# Altium PCB DT01.PcbDoc (part 2 of 3)
Units mil, origin at the board's own origin, x right, y up, seen from the top; angles counter-clockwise.
Board outline 2134.7 x 2226.1 mil, 2 copper layers (Top Layer, Bottom Layer), stack 57.918 mil thick; 95 components, 87 nets, 468 pads, 300 vias.
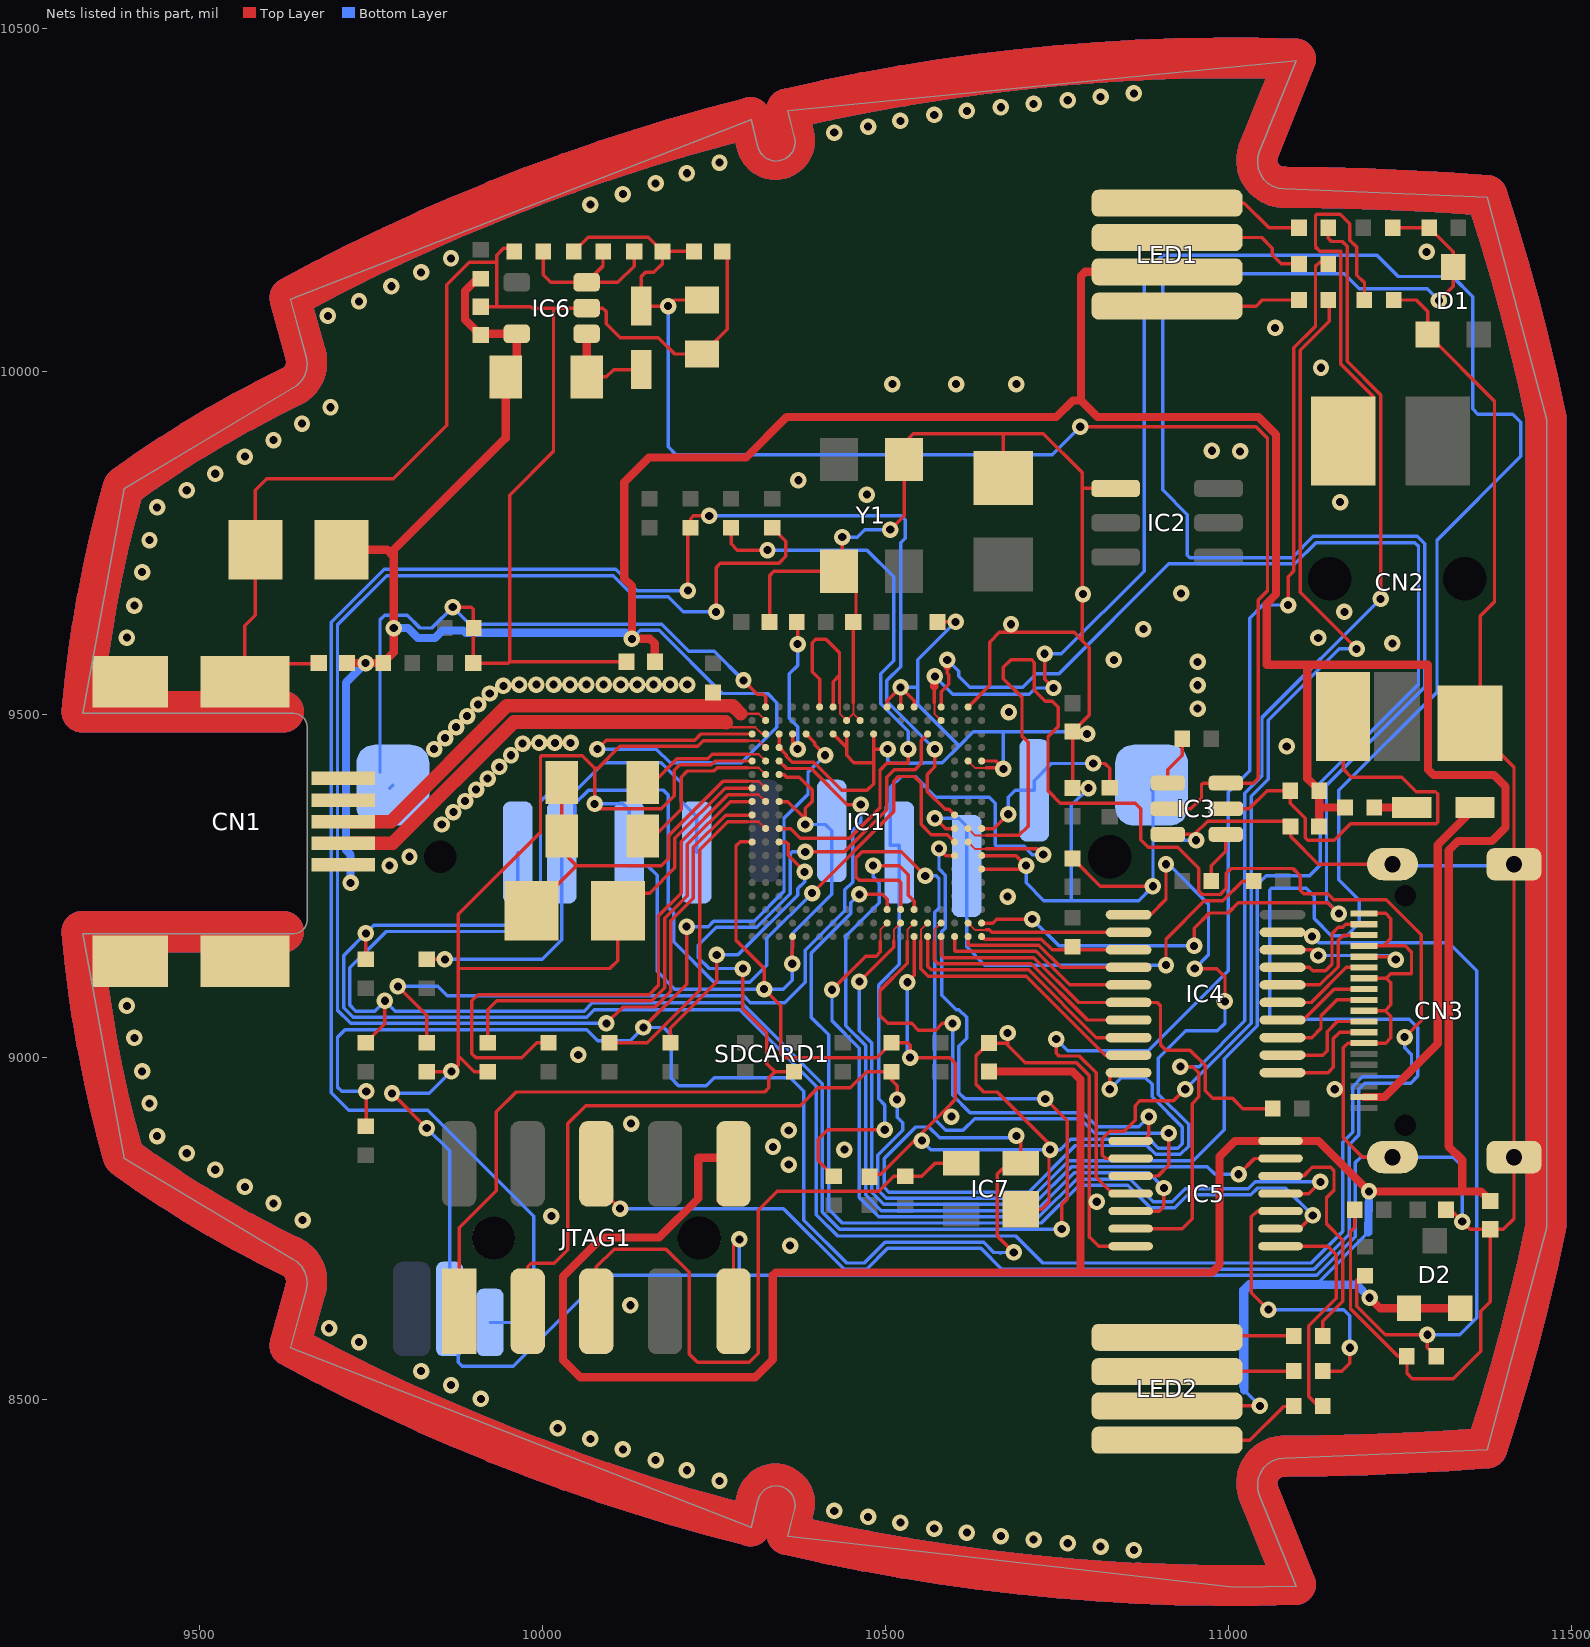
[diagram p2: the nets of this part, all layers, seen from the top]

## Via types
v1: diameter 24, hole 11.81, Top Layer to Bottom Layer, tented both sides, 295 vias
v2: diameter 24.02, hole 11.81, Top Layer to Bottom Layer, tented both sides, 5 vias

## Nets (pads, with @x,y where several pads share a name; then routed paths per layer and width w, separated by ;. In a path a pad name is that pad's centre, name@x,y a point inside that pad or via, vN(x,y) a via of type N, cw(c..) or ccw(c..) an arc to the next point about the centre after c; other vN are vias at no path point) (continued)
5V0: C15.2 C16.2 C17.2 C18.2 C19.1 C20.1 C21.1 CN1.1 D2.1 D2.2 IC1.T18 IC5.14 IC6.5 JTAG1.10 L3.1 LED1.A LED2.A R18.2 R20.2 R37.1 R42.1 | length 9669.8
  Top Layer w5: CN1.1@9709.36,9280.11 CN1.1@9710.34,9279.12 ; C18.2@9713.01,9572.3 C18.2@9715.04,9574.34 ; R42.1@9909.38,10134.7 R42.1@9909.87,10134.7 ; C15.2@9909.67,10052.76 C15.2@9909.87,10052.56 ; v1(10080.01,9449.02) 10093.01,9462.02 10222.01,9462.02 10230.91,9470.92 IC1.T18@10305.52,9470.92 ; JTAG1.10@10255.25,8790.07 10278.38,8813.21 JTAG1.10@10278.38,8844.21 10278.38,8849.02 JTAG1.10@10278.39,8900.76 ; JTAG1.10@10270.01,8790.07 JTAG1.10@10278.38,8798.45 ; LED2.A@10910.6,8491.32 v1(11045.79,8491.32) ; C20.1@11132,9336.21 11132.51,9336.72 11132.51,9363.74 ; 11132.53,9363.76 R20.2@11132.53,9388.34
  Top Layer w12: C19.1@9707.18,9739.65 9773.15,9739.65 9783.01,9729.79 ; C18.2@9715.04,9574.34 v1(9742,9574.34) R18.2@9767.66,9574.34 9783.01,9589.69 v1@9783.01,9625 ; v1(9783.01,9625.49) 9783.01,9729.79 ; R42.1@9909.38,10134.7 9904.69,10134.7 9887.01,10117.02 9887.01,10075.02 9909.47,10052.56 9909.67,10052.76 9911.44,10054.53 IC6.5@9962.36,10054.53 9962.36,10007.65 L3.1@9946.26,9991.56 9946.27,9902.28 9783.01,9739.02 9783.01,9729.79 ; C21.1@10163.75,9576.31 10163.75,9602.85 10156.85,9609.74 v1(10130.28,9609.74) 10130.28,9686.72 10119,9698 10119,9838 10155,9874 10297,9874 10356,9933 10749,9933 10773.23,9957.23 10785,9957.23 ; JTAG1.10@10278.38,8844.21 JTAG1.10@10269.59,8853 ; JTAG1.10@10278.39,8849.02 10274.4,8853 JTAG1.10@10269.59,8853 ; C16.2@10650.82,8979.01 10772.99,8979.01 10784.51,8967.49 10784.51,8686.49 ; LED1.A@10910.6,10144.87 10790.87,10144.87 10785,10139 10785,9957.23 ; C20.1@11132,9336.21 11132.51,9336.72 11132.51,9363.74 ; 11132.51,9363.78 R20.2@11132.51,9388.36 11115,9405.88 11115,9572 ; 11132.53,9363.76 11132.77,9364 R37.1@11169.99,9364 ; v1(11206,8649) 11221.41,8633.59 D2.1@11263.33,8633.59 D2.2@11338.13,8633.59 ; 11341,8805 11341,8850 11321.19,8869.81 11321.19,9301.19 11335,9315 11384,9315 11403.86,9334.86 11403.86,9394.14 11387,9411 11299,9411 11291,9419 11291,9572 11115,9572 ; C17.2@11381.93,8790.08 11368.01,8804 v1(11205,8804) 11131.34,8877.66 IC5.14@11075.97,8877.66 11009.66,8877.66 10987,8855 10987,8697 10976,8686 10340.07,8686 10335.79,8681.72 10335.79,8558.79 10310,8533 10055,8533 10030,8558 10030,8680 10087,8737 10170,8737 10227,8794 10227,8853 JTAG1.10@10269.59,8853 ; 10785,9957.23 10809.23,9933 11044,9933 11069.51,9907.49 11069.51,9674.71 11056,9661.21 11056,9572 11115,9572
  Bottom Layer w5: v1(10080.01,9449.02) 10165.73,9449.02 10185.92,9428.83 10289.9,9428.83 10341.7,9480.63 10341.7,9516.41 10328.06,9530.04 10262.26,9530.04 10170.29,9622.02 10142.55,9622.02 v1(10130.28,9609.74) ; v1(11045.79,8491.32) 11023,8514.11 11017.85,8519.26 11017.85,8661.17 11029.31,8672.63 11132.23,8672.63 11203.82,8744.22
  Bottom Layer w12: v1(9720,9254) 9720,9295 9713.5,9301.5 9713.5,9545.84 v1(9742,9574.34) ; v1(9783.01,9625.49) 9803.63,9625.49 9818.11,9611 9842.98,9611 9854,9622.02 9884.63,9622.02 9888.13,9618.52 10121.51,9618.52 v1(10130.28,9609.74) ; 11023,8514.11 11023,8659 11032,8668 11187,8668 v1(11206,8649) ; 11203.82,8744.22 v1(11205,8804)
12V: C4.2 C5.2 C6.2 D4.2 IC3.2 IC3.6 R40.2 | length 2174.7
  Top Layer w5: R40.2@10045.81,10174.58 10066.45,10195.22 10154.25,10195.22 C6.2@10174.89,10174.58 ; C5.2@10222.94,10174.58 C5.2@10220.81,10174.58 C6.2@10174.89,10174.58 ; C4.2@10232.62,10103.74 10191.86,10103.74 v1(10183.01,10094.89) D4.2@10144.06,10094.89 10144.06,10138 10150.06,10144 10162,10144 10174.89,10156.89 C6.2@10174.89,10174.58 ; v1(10784.01,9919.02) 11040.28,9919.02 11057.01,9902.29 11057.01,9679.89 11043.5,9666.38 11043.5,9406.52 11036,9399.02 IC3.6@10996.58,9399.02 ; IC3.2@10895.97,9361.98 IC3.2@10911.57,9361.98 10945.24,9361.98 10960.78,9377.52 10960.78,9397.16 10963.01,9399.39 IC3.6@10996.22,9399.39
  Bottom Layer w5: v1@10181.45,10093.33 v1(10183.01,10094.89) 10183.01,9889.61 10194.6,9878.02 10743.01,9878.02 v1(10784.01,9919.02)
CARD_DET: IC1.K3 R22.1 SDCARD1.SW3 | length 2746.8
  Top Layer w5: v1(10212.01,9680.02) 10212.01,9767.72 R22.1@10215.89,9771.61 10215.89,9784.9 10220.01,9789.02 v1(10243.01,9789.02) ; v1(10572.01,9449.02) 10572.01,9422.96 10561.01,9411.96 10561.01,9387.02 10587.01,9361.02 10592.59,9361.02 IC1.K3@10600.8,9352.81
  Bottom Layer w5: SDCARD1.SW3@9923.5,8612.95 9968.9,8612.95 9987.01,8631.05 9987.01,8768.03 9832.52,8922.52 9717.2,8922.52 9692,8947.72 9692,9634.14 9768.88,9711.02 10106.7,9711.02 10137.7,9680.02 v1(10212.01,9680.02) ; v1(10243.01,9789.02) 10523.01,9789.02 10528.8,9783.22 10528.8,9756.36 10522.01,9749.57 10522.01,9569.02 10502.01,9549.02 10502.01,9519.02 v1(10572.01,9449.02)
D+: CN1.3 IC1.U17 R16.1 | length 688.2
  Top Layer w3: 10295.71,9500.5 10315.32,9500.5 IC1.U17@10325.21,9490.61
  Top Layer w20: CN1.3@9709.38,9343.1 9779.01,9343.1 9948.24,9512.33 10248.36,9512.33 10277.12,9512.33 10288.95,9500.5
D-: CN1.2 IC1.T17 | length 698.2
  Top Layer w3: 10268.01,9487.5 10274.69,9480.81 10310.4,9480.81 10320.29,9470.92 IC1.T17@10325.21,9470.92 IC1.T17@10327.18,9470.92
  Top Layer w20: CN1.2@9709.38,9311.6 9781.46,9311.6 9958.18,9488.33 10267.18,9488.33 10268.01,9487.5
GND: C1.2 C2.1 C3.2 C4.1 C5.1 C7.1 C8.1 C9.1 C10.2 C11.2 C12.2 C13.2 C14.2 C15.1 C16.1 C17.1 C18.1 C19.2 C20.2 C21.2 CN1.4 CN1.5 CN1.MH1 CN1.MH2 CN1.MH3 CN1.MH4 CN2.1 CN3.1 CN3.4 CN3.7 CN3.10 CN3.13 CN3.MH1 CN3.MH2 CN3.MH3 CN3.MH4 D1.1 IC1.A6 IC1.A15 IC1.F1 IC1.G1 IC1.H18 IC1.L16 IC1.M18 IC1.N16 IC1.P1 IC1.P2 IC1.P18 IC1.R16 IC1.R17 IC1.T9 IC1.T11 IC1.T12 IC1.T16 IC1.U10 IC1.U11 IC1.V2 IC1.V6 IC1.V7 IC1.V8 IC1.V12 IC1.V13 IC1.V17 IC2.1 IC3.3 IC4.10 IC5.7 IC6.2 IC7.1 JTAG1.9 JTAG1.PEGA JTAG1.PEGB R4.2 R6.2 R15.2 R17.2 R19.2 R21.2 R32.1 R45.1 SDCARD1.3 SDCARD1.6 SDCARD1.MH1 SDCARD1.MH2 SDCARD1.SW1 Y1.2 Y1.4 | length 35773.3
  Top Layer w3: 10299.03,9461.13 10315.32,9461.13 IC1.R17@10325.21,9451.24 ; 10433.43,9515.92 10433.43,9500.5 IC1.U11@10443.27,9490.66 ; IC1.U11@10443.22,9490.61 IC1.U11@10443.27,9490.66 ; IC1.U11@10443.32,9490.61 IC1.U11@10443.27,9490.66 ; 10453.11,9516.82 10453.11,9500.5 ; IC1.U10@10463,9490.61 10453.11,9500.5 ; IC1.P2@10620.48,9431.55 10630.37,9421.66 10646.66,9421.66 ; IC1.U11@10443.27,9490.66 10453.11,9500.5
  Top Layer w5: CN1.MH3@9398.64,9139.36 9398.64,9171.02 CN1.MH4@9565.96,9171.02 ; CN1.MH2@9398.64,9546.84 9398.64,9515.02 CN1.MH1@9565.96,9515.02 ; CN1.MH4@9565.96,9139.36 CN1.MH4@9566.3,9139.02 ; C18.1@9673.7,9574.34 9673.01,9573.64 9592.77,9573.64 CN1.MH1@9565.96,9546.84 9565.97,9629.02 9581.2,9644.25 C19.2@9581.2,9739.65 9581.2,9826.2 9598,9843 9782,9843 9860,9921 9860,10126.02 9893,10159.02 9933.01,10159.02 ; v1(9780.49,8947) v1(9831.14,8896.34) ; R4.2@9831.15,8978.5 9867,8978.5 9867.5,8978.5 9877.01,8988.01 9877.01,9002.02 ; v1(9869.01,9656.02) 9896.06,9656.02 9899.05,9653.03 9899.05,9625.51 C2.1@9899.05,9574.34 9950.21,9574.34 9952.18,9576.31 ; C15.1@9909.87,10093.9 9933.01,10093.9 ; R6.2@9919.96,8978.5 9900.52,8978.5 9877.01,9002.02 ; R45.1@9958.55,10174.58 9958.55,10179.02 9943.01,10179.02 9933.01,10169.02 9933.01,10159.02 ; IC6.2@10053.01,10092.03 10016,10092.03 ; IC6.2@10064.36,10092.03 10088.01,10092.03 10093.01,10087.03 10093.01,10069.02 10113.01,10049.02 10168.66,10049.02 10192.67,10025 C4.1@10232.62,10025 10269.02,10061.4 10269.02,10167.7 C5.1@10262.15,10174.58 ; C1.2@10109.64,9213.21 10109.64,9140.4 10098.26,9129.02 9878.52,9129.02 9877.01,9130.54 ; C21.2@10122.41,9576.31 9952.18,9576.31 ; C1.2@10129.64,9239.02 10156.01,9239.02 10193.01,9276.02 10193.01,9319.02 10266.17,9392.18 IC1.M18@10305.52,9392.18 ; JTAG1.9@10278.38,8629.21 10278.38,8725.38 v1(10287,8734) ; v1(10293.01,9549.02) 10312.97,9529.06 10321.18,9529.06 10325.21,9525.02 IC1.V17@10325.21,9510.29 IC1.V17@10323.01,9510.29 ; 10299.03,9461.13 10234.12,9461.13 10226.01,9453.02 10112.8,9453.02 10080.8,9421.02 10076.01,9421.02 ; IC1.P18@10305.52,9431.55 10251.54,9431.55 10246.01,9426.02 10200.01,9426.02 10192.01,9418.02 10192.01,9381.02 10173.01,9362.02 10083.01,9362.02 v1(10076.01,9369.02) 10076.01,9421.02 ; IC1.H18@10305.52,9313.44 10303.01,9313.44 10303.01,9314.02 10288.01,9314.02 10282.01,9308.02 10282.01,9170.02 10323.01,9129.02 v1(10323.01,9099.02) 10347.01,9075.02 10347.01,9005.02 10353.01,8999.02 10487.03,8999.02 R15.2@10508.88,9020.86 10532.2,9020.86 10536.01,9017.06 v1(10536.01,8999.02) 10594.01,8999.02 10602.01,8991.02 10602.01,8938.02 10586.49,8922.51 10547.49,8883.51 10493.01,8829.02 10476.65,8829.02 C9.1@10476.65,8825.52 ; C12.2@10331.03,9634.36 10331.03,9702.03 10337.34,9708.34 Y1.2@10432.1,9708.33 10437.01,9713.24 v1(10437.01,9758.02) ; IC1.T16@10343.01,9470.92 IC1.T16@10344.89,9470.92 IC1.R16@10344.89,9451.24 ; IC1.L16@10344.89,9372.5 10357.68,9372.5 v1@10383.01,9347.17 ; IC1.N16@10344.89,9411.87 10351.85,9411.87 10355.7,9408.02 10374.32,9408.02 10393.01,9389.33 10393.01,9372.6 10383.01,9362.6 v1@10383.01,9347.17 ; IC1.R16@10344.9,9449.13 IC1.R16@10344.89,9451.24 ; v1(10364.01,9136.02) 10364.01,9159.49 ; 10364.58,9160.06 IC1.A15@10364.58,9175.65 ; v1(10383.01,9339.02) v1@10383.01,9347.17 ; IC1.V13@10403.95,9510.29 10404.01,9510.29 10404.01,9550.75 10393.01,9561.75 10393.01,9604.01 10398.14,9609.14 10413.23,9609.14 10433.01,9589.36 10433.01,9556.61 ; IC1.T12@10423.63,9469.02 10423.01,9469.02 10423.01,9470.92 IC1.T12@10423.63,9470.92 10443.32,9451.24 ; IC1.V12@10423.63,9510.29 10423.63,9547.24 10433.01,9556.61 ; 10433.01,9515.92 10433.01,9556.61 ; IC1.T11@10443.01,9470.92 IC1.T11@10443.32,9470.92 10443.32,9451.24 ; C13.2@10453.03,9634.36 10453.03,9516.9 10453.11,9516.82 ; C13.2@10457.01,9639.02 Y1.2@10457.01,9708.33 ; 10482.01,9429.02 10454.01,9429.02 10443.32,9439.71 10443.32,9451.24 ; IC1.V8@10502.01,9509.02 IC1.V8@10502.37,9509.02 ; IC1.V8@10502.37,9510.29 10502.38,9519.39 v1(10522.01,9539.02) ; v1(10503.01,9449.02) 10482.69,9449.02 ; v1(10507.01,9769.02) 10527.11,9789.12 Y1.4@10527.1,9871.33 ; IC1.V7@10522.06,9510.29 10522.06,9538.97 10541.74,9519.28 IC1.V6@10541.74,9510.29 ; Y1.4@10527.11,9895.52 10540.61,9909.02 10673.45,9909.02 ; v1(10532.01,9109.02) 10542.01,9119.02 IC1.A6@10542.01,9175.65 ; IC1.A6@10541.74,9176.13 IC1.A6@10541.98,9175.89 ; C14.2@10574.01,9632.32 C14.2@10576.04,9634.36 v1(10602.35,9634.36) ; IC1.V2@10620.48,9510.29 10652.01,9541.81 10652.01,9605.02 10666.01,9619.02 10683,9619.02 10775.01,9619.02 10787.01,9607.02 ; IC1.F1@10640.17,9274.07 10700.06,9274.07 v1(10705.01,9279.02) 10690.27,9293.76 IC1.G1@10640.17,9293.76 ; IC1.P1@10640.17,9431.55 10660.47,9431.55 v1@10670.27,9421.76 ; IC1.G1@10641.96,9291.97 IC1.G1@10643.01,9293.02 ; 10646.66,9421.66 v1@10670.36,9421.66 ; C10.2@10671.49,9843.97 10671.49,9907.06 10673.45,9909.02 ; 10672.04,9620.04 ccw(c10674.5,9622.5) 10674.5,9619.02 ; v1(10678,9035) 10678,9020.35 ; IC7.1@10697.08,8778.28 10727.58,8778.27 10738.39,8789.09 10738.39,8865 10738.39,8873.63 10663.01,8949.02 10643.01,8949.02 10632.01,8960.02 10632.01,9001.54 C16.1@10650.82,9020.35 10678,9020.35 ; C11.2@10772.84,9288.18 C11.2@10772.84,9289.49 10813.31,9249.02 v1(10890.01,9249.02) ; C8.1@10772.84,9392.31 C7.1@10772.84,9474.46 10797.01,9498.63 10797.01,9597.02 10787.01,9607.02 ; v1(10827,8953) 10827,8970 10834.17,8977.17 IC4.10@10854.51,8977.17 ; IC2.1@10835.6,9829.01 10787.01,9829.01 ; IC2.1@10835.6,9830.16 10841.71,9830.16 IC2.1@10840.56,9829.01 ; IC5.7@10857.46,8724.12 10810.88,8724.12 10798.01,8736.99 10797.01,8736.99 10797.01,8789 10797.01,8973 10778.49,8991.51 10703.5,8991.51 10678,9017.01 10678,9020.35 ; IC3.3@10916,9329.01 IC3.3@10911.57,9324.58 10950.19,9324.58 10969.63,9344.02 11082.86,9344.02 C20.2@11090.66,9336.21 11090.66,9321.5 11131,9281.16 CN3.MH4@11239.2,9281.16 ; R21.2@11184.01,8777.18 11184.01,8752.01 11178,8746 11178,8633 11247.25,8563.75 R32.1@11260.38,8563.75 11260.38,8538.62 11268,8531 11328,8531 11368,8571 11368,8629 11382,8643 C17.1@11382,8748.74 ; CN3.10@11197.86,9067.58 11228.57,9067.58 ; CN3.7@11197.86,9114.82 11230.42,9114.82 ; CN3.4@11197.86,9162.07 11226.22,9162.07 ; CN3.1@11197.86,9209.02 11193.01,9209.02 11193.01,9209.31 CN3.1@11197.86,9209.31 11229.35,9209.31 11237.01,9201.66 11237.01,9172.85 11226.22,9162.07 ; CN3.MH1@11239.2,8854 11195.48,8854 11167.5,8881.98 11167.5,8953 11167.5,9013.51 11174.32,9020.33 CN3.13@11197.86,9020.33 11229.14,9020.33 11237.01,9028.2 11237.01,9059.14 11228.57,9067.58 ; R19.2@11240.75,10103.73 11273.67,10103.73 11290.41,10086.99 D1.1@11290.41,10053.53 11388.01,9955.94 11388.01,9664.02 11367.01,9643.02 CN2.1@11367.01,9489.02 ; C3.2@11317.37,8777.18 11323.82,8777.18 v1(11341,8760) 11352.26,8748.74 C17.1@11381.93,8748.74 C17.1@11382,8748.74 ; CN2.1@11352.38,9489.02 CN2.1@11352.38,9486.71 11416.36,9422.73 CN3.MH3@11416.36,9281.16 CN3.MH2@11416.36,8854 11416.36,8764.36 11400.74,8748.74 C17.1@11382,8748.74 ; 9877.01,9002.02 9877.01,9130.54 ; 9877.01,9130.54 9877.01,9208.02 9997.01,9328.02 9997.01,9438.02 9998.01,9439.02 10058.01,9439.02 10076.01,9421.02 ; 9933.01,10093.9 9933.01,10159.02 ; 9933.01,10093.9 9983.01,10093.9 9984.87,10092.03 10016,10092.03 ; 9952.18,9576.31 9952.18,9819.18 10016,9883 10016,10092.03 ; IC1.R16@10344.89,9451.24 10355.53,9440.6 10355.53,9438.49 10364.35,9429.67 10395.35,9429.67 10436.01,9389.02 10473.01,9389.02 10482.69,9398.7 10482.69,9449.02 ; 10482.69,9449.02 IC1.T9@10482.69,9469.34 ; IC1.T9@10482.69,9469.34 IC1.T9@10482.69,9470.92 IC1.T9@10482.69,9469.34 ; 10673.45,9909.02 10730.28,9909.02 10787.01,9852.29 10787.01,9829.01 ; 10787.01,9607.02 10787.01,9675 10787.01,9829.01 ; 11226.22,9162.07 11257.93,9162.07 11267,9153 11267,9121 11266.59,9121.41 11237.01,9121.41 11230.42,9114.82 ; 11228.57,9067.58 11236.91,9075.92 11236.91,9108.34 11230.42,9114.82
  Top Layer w60: 9622,9182.61 9565.96,9182.61 9398.64,9182.61 9328.42,9182.61 ccw(c11116.51,9343.04) 9388.86,8854.97 ccw(c10303.51,10107.8) 9633.7,8708.68 cw(c9616.7,8673.17) 9654.65,8662.69 9631.51,8578.94 ccw(c11007.41,11111.18) 10303.15,8316.66 10312.86,8356.21 cw(c10339.63,8349.64) 10366.39,8343.07 10356.73,8303.7 ccw(c11007.41,11111.18) 11097.83,8230.7 11044.32,8363.83 cw(c11080.85,8378.51) 11080.68,8417.88 ccw(c11063.75,12502.73) 11376.58,8429.84 ccw(c8605.87,9343.04) 11463.13,8754.11 11463.13,8854 11463.13,9281.16 11463.13,9931.98 ccw(c8605.87,9343.04) 11376.58,10256.24 ccw(c11063.75,6183.36) 11080.68,10268.2 cw(c11080.85,10307.57) 11044.32,10322.26 11097.83,10455.38 ccw(c11007.41,7574.91) 10356.73,10382.38 10366.39,10343.02 cw(c10339.63,10336.45) 10312.86,10329.88 10303.15,10369.43 ccw(c11007.41,7574.91) 9631.51,10107.14 9654.65,10023.4 cw(c9616.7,10012.92) 9633.7,9977.41 ccw(c10303.51,8578.29) 9388.86,9831.12 ccw(c11116.51,9343.04) 9328.42,9503.48 9398.64,9503.48 9565.96,9503.48 9622,9503.48
  Bottom Layer w5: SDCARD1.MH2@9763.01,9415.18 9763.01,9637.3 9769.89,9644.18 9802.61,9644.18 9821.3,9625.49 9838.47,9625.49 v1(9869.01,9656.02) 9894.01,9631.02 10174.01,9631.02 10213.14,9591.89 10250.14,9591.89 v1(10293.01,9549.02) ; SDCARD1.MH2@9777.01,9391.64 SDCARD1.MH2@9781.77,9396.41 ; v1(9780.49,8947) 9835,8947 v1(9867,8979) ; v1(9831.14,8896.34) 9864.45,8863.04 SDCARD1.SW1@9864.45,8632.63 ; SDCARD1.SW1@9877.01,8632.63 9877.01,8555.02 9883.01,8549.02 9957.12,8549.02 10089.73,8681.63 10287,8681.63 ; v1(10076.01,9369.02) 10117.13,9369.02 10126.34,9359.81 10126.26,9359.72 SDCARD1.6@10126.26,9298.18 SDCARD1.6@10126.34,9298.27 ; SDCARD1.6@10126.26,9279.02 10153.01,9279.02 10167.01,9265.02 10167.01,9125.02 10193.01,9099.02 v1(10323.01,9099.02) 10351.18,9099.02 10364.01,9111.84 v1(10364.01,9136.02) 10364.01,9179.75 10421.54,9237.28 SDCARD1.3@10421.54,9329.68 10412.2,9339.02 v1(10383.01,9339.02) ; v1(10287,8734) 10287,8681.63 ; v1(10437.01,9758.02) 10458.6,9758.02 10469.6,9769.02 v1(10507.01,9769.02) ; v1(10503.01,9449.02) 10503.01,9431.75 10506.73,9428.02 10555,9428.02 10556,9429.02 10583.01,9429.02 10607.51,9453.52 ; v1(10522.01,9539.02) 10547.01,9539.02 ; v1(10532.01,9109.02) 10532.01,9003.02 v1(10536.01,8999.02) ; v1(10553,8878) 10566,8865 v1(10740,8865) 10755,8865 10770.02,8880.02 10884.98,8880.02 10897.98,8867.02 10926.29,8867.02 10933,8873.73 10933,8898 10889,8942 10889,8960.02 10879,8970.02 10844.02,8970.02 v1(10827,8953) ; v1(10602.35,9634.36) 10547.01,9579.02 10547.01,9539.02 ; v1(10672.01,9420.02) 10672.01,9474.02 ; v1(10705.01,9279.02) 10705.01,9254 10730.99,9228.02 10771,9228.02 ; v1(10794,9471) 10790.98,9474.02 10672.01,9474.02 ; v1(10796,9392) 10771,9367 10771,9228.02 ; SDCARD1.MH1@10888.07,9396.41 10888.07,9389.02 10890.01,9387.08 v1(10890.01,9249.02) 10869.01,9228.02 10771,9228.02 ; 10892.01,9316 v1(10953,9316) ; 11185.01,8845.18 11185.01,8738.13 11128.5,8681.63 10287,8681.63 ; 11185.01,8846.16 11192.84,8854 CN3.MH1@11239.2,8854 11328,8854 11341,8841 v1(11341,8760) ; CN3.MH4@11239.2,9281.16 11243.01,9281.16 11243.01,9279.02 11413.01,9279.02 11413.01,9281.16 CN3.MH3@11416.36,9281.16 ; 10547.01,9539.02 10547.01,9514.02 10607.51,9453.52 ; 10607.51,9453.52 10628.01,9474.02 10672.01,9474.02
  Bottom Layer w60: 9622,9182.61 9366.52,9182.61 9328.42,9182.61 ccw(c11116.51,9343.04) 9388.86,8854.97 ccw(c10303.51,10107.8) 9633.7,8708.68 cw(c9616.7,8673.17) 9654.65,8662.69 9631.51,8578.94 ccw(c11007.41,11111.18) 10303.15,8316.66 10312.86,8356.21 cw(c10339.63,8349.64) 10366.39,8343.07 10356.73,8303.7 ccw(c11007.41,11111.18) 11097.83,8230.7 11044.32,8363.83 cw(c11080.85,8378.51) 11080.68,8417.88 ccw(c11063.75,12502.73) 11376.58,8429.84 ccw(c8605.87,9343.04) 11463.13,8754.11 11463.13,8854 11463.13,9281.16 11463.13,9931.98 ccw(c8605.87,9343.04) 11376.58,10256.24 ccw(c11063.75,6183.36) 11080.68,10268.2 cw(c11080.85,10307.57) 11044.32,10322.26 11097.83,10455.38 ccw(c11007.41,7574.91) 10356.73,10382.38 10366.39,10343.02 cw(c10339.63,10336.45) 10312.86,10329.88 10303.15,10369.43 ccw(c11007.41,7574.91) 9631.51,10107.14 9654.65,10023.4 cw(c9616.7,10012.92) 9633.7,9977.41 ccw(c10303.51,8578.29) 9388.86,9831.12 ccw(c11116.51,9343.04) 9328.42,9503.48 9366.52,9503.48 9622,9503.48
  other v1: 10862.29,8280.95 10813.56,8286.07 10765.82,8291.09 10716.09,8296.32 10668.36,8301.33 10618.63,8306.56 10571.06,8312.46 10521.82,8321.14 10474.55,8329.47 10425.31,8338.16 10258,8382.09 10210.45,8397.54 10164.8,8412.37 10117.24,8427.82 10069.69,8443.27 10022.14,8458.72 9910.01,8501.43 9866.5,8521.71 9823,8542 9732.37,8584.26 9688.87,8604.55 10128,8638 9650.11,8762.15 10013,8768 9607.67,8786.65 10808,8789 9566.1,8810.65 9522.8,8835.65 10359,8843 9481.23,8859.65 10440,8865 10336,8869 9437.93,8884.65 10359,8893 10129,8903 10596,8913 9426.91,8932.39 11155,8953 9416.11,8979.16 10052,9003 9404.86,9027.88 9394.07,9074.65 10678,9234 9777.02,9279.12 9806,9292 9853,9339 9870,9357 9887,9373 9903,9390 9920,9406 9937,9423 9954,9440 9842,9449 11085,9453 9971,9457 9995,9458 10018,9458 10041,9458 9858,9465 9874,9481 9890,9497 10680,9503 10955,9508 9906,9514 9923,9530 9943,9541 10955,9542 9966,9543 9991,9543 10016,9543 10040,9543 10064,9543 10089,9543 10114,9543 10138,9543 10162,9543 10186,9543 10211,9543 10955,9576 10833,9579 11239,9603 9394.07,9611.44 11131,9611 10876,9624 10683,9631 11169,9649 9404.86,9658.21 10788,9675 10931,9676 9416.11,9706.93 9426.91,9753.7 9437.93,9801.44 11163,9809 10473,9820 9481.23,9826.44 10373,9841 9522.8,9850.44 9566.1,9875.44 11017,9883 10976,9884 9607.67,9899.44 9649.24,9923.44 9690.81,9947.44 10510,9981 10603,9981 10691,9981 11135,10005 11068,10063 9687.05,10080.69 9732.37,10101.82 9779.5,10123.8 9823,10144.09 9866.5,10164.37 11289,10174 10069.69,10242.81 10117.24,10258.27 10164.8,10273.72 10210.45,10288.55 10258,10304 10425.31,10347.93 10474.55,10356.61 10521.82,10364.95 10571.06,10373.63 10618.63,10379.53 10668.36,10384.75 10716.09,10389.77 10765.82,10395 10813.56,10400.01 10862.29,10405.14
  other v2: 10360.98,8725
HARD.TCK: CN3.6 IC4.15 | length 140.1
  Top Layer w5: IC4.15@11078.92,9079.53 11120.53,9079.53 11171.57,9130.57 CN3.6@11197.86,9130.57
HARD.TDI: CN3.9 IC4.13 | length 152.3
  Top Layer w5: IC4.13@11078.92,9028.35 11121.36,9028.35 11135.01,9042 11135.01,9060.01 11158.33,9083.33 CN3.9@11197.86,9083.33
HARD.TDO: CN3.8 IC4.14 | length 148
  Top Layer w5: IC4.14@11078.92,9053.94 11108.92,9053.94 11154,9099.02 11197.86,9099.02 11203.01,9099.02 11203.01,9099.07 CN3.8@11197.86,9099.08
HARD.TMS: CN3.5 IC4.18 | length 218.9
  Top Layer w5: IC4.18@11078.92,9156.3 11122.7,9156.3 v1(11131,9148) ; CN3.5@11197.86,9146.32 11239.68,9146.32 v1(11244,9142)
  Bottom Layer w5: v1(11131,9148) 11238,9148 v1(11244,9142)
JTSEL: IC1.U4 JTAG1.6 | length 4768.3
  Top Layer w3: 10571.22,9516.79 10571.22,9500.5 IC1.U4@10581.11,9490.61
  Top Layer w5: JTAG1.6@10078.38,8844.21 10078.38,8849.02 10087.01,8849.02 10087.01,8844.21 10087.01,8805.02 v1(10113.01,8779.02) ; 10571.22,9516.79 10571.22,9540.26 ; v1(10732.01,9588.02) 10732.01,9551.02 v1(10745.01,9538.02)
  Top Layer w12: 10571.22,9540.26 10571.22,9554.24 v1(10572.01,9555.02)
  Bottom Layer w5: v1(10113.01,8779.02) 10351.29,8779.02 10439.68,8690.63 10472.59,8690.63 10502.98,8721.02 10639.27,8721.02 10669.67,8690.63 11124.77,8690.63 11176.01,8741.86 11176.01,8872.29 11190.01,8886.29 11190.01,8953 11199.01,8962 11265.71,8962 11276.01,8972.29 11276.01,9042.61 11263.85,9054.77 11060,9054.77 11060,9243.27 11062.73,9246 11113.27,9246 11125,9234.27 11125,9202 11150,9177 11172.32,9177 11191.01,9195.69 11191.01,9228.73 11161.01,9258.73 11161.01,9388.83 11304.19,9532.02 11304.19,9753.59 11426.5,9875.91 11426.5,9925.52 11414.61,9937.42 11363.54,9937.42 11356.01,9944.95 11356.01,10108.75 11326.73,10138.02 11247.62,10138.02 11216.62,10169.02 10903.9,10169.02 10877.01,10142.13 10877.01,9708.47 10756.55,9588.02 v1(10732.01,9588.02) ; v1(10572.01,9555.02) 10598.01,9529.02 10709.86,9529.02 10718.86,9538.02 v1(10745.01,9538.02)
LED1.BLU: IC1.C7 IC5.3 | length 1102.2
  Top Layer w5: IC1.C7@10522.01,9215.02 10522.01,9254.43 10518.96,9257.47 10461.89,9257.47 10457.01,9262.35 10457.01,9290.29 10465.73,9299.02 10523.01,9299.02 v1(10558.01,9264.02) ; IC5.3@10857.46,8826.48 10897.32,8826.48 10913.01,8842.16 v1(10913.01,8889.02)
  Bottom Layer w5: v1(10558.01,9264.02) 10573.99,9264.02 10578.01,9260 10578.01,9217.02 10572.01,9211.02 10572.01,8908.99 10588,8893 10612.98,8893 10630,8910.02 10784,8910.02 10805,8889.02 v1(10913.01,8889.02)
LED1.GRN: IC1.B6 IC5.1 | length 754.3
  Top Layer w3: 10531.85,9165.84 10531.85,9185.44 IC1.B6@10541.74,9195.33
  Top Layer w5: 10531.85,9165.84 10531.85,9169.02 ; 10532.01,9169.02 10532.01,9137.02 10492.01,9097.02 10492.01,9060.02 10503.01,9049.02 10538.01,9049.02 10548.01,9039.02 10573.08,9039.02 10583.08,9049.02 v1(10598.01,9049.02) ; IC5.1@10857.46,8877.66 10875.66,8877.66 10884,8886 v1(10884,8913)
  Bottom Layer w5: v1(10598.01,9049.02) 10598.01,8944.23 10623.22,8919.02 10787.73,8919.02 10808.73,8898.02 10869.02,8898.02 v1(10884,8913)
LED1.RED: IC1.C6 IC5.5 | length 1181.9
  Top Layer w5: v1(10482.01,9279.02) 10520.05,9279.02 10533.27,9265.79 10533.27,9235.67 10541.74,9227.2 IC1.C6@10541.74,9215.02 ; IC5.5@10857.46,8775.3 10899.3,8775.3 10906.01,8782.01 v1(10906.01,8809.02)
  Bottom Layer w5: v1(10482.01,9279.02) 10482.01,9262.75 10491.01,9253.75 10491.01,9225.21 10442.01,9176.21 10442.01,9045.75 10471.01,9016.75 10471.01,8798.88 10493.86,8776.02 10719.94,8776.02 10774.94,8831.02 10884.01,8831.02 v1(10906.01,8809.02)
LED2.BLU: IC1.B8 IC5.11 | length 1256.2
  Top Layer w3: 10492.48,9169.16 10492.48,9185.44 IC1.B8@10502.37,9195.33
  Top Layer w5: v1(10422.01,9098.02) 10471.22,9147.23 10486.49,9147.23 10492.48,9153.22 10492.48,9169.16 ; IC5.11@11075.97,8800.89 11116.87,8800.89 v1(11134.01,8818.02)
  Bottom Layer w5: v1(10422.01,9098.02) 10422.01,9053.02 10462.01,9013.02 10462.01,8795.15 10490.14,8767.02 10723.66,8767.02 10778.66,8822.02 10857.17,8822.02 10890.17,8789.02 10918,8789.02 10936.98,8808 11028.89,8808 11038.91,8818.02 v1(11134.01,8818.02)
LED2.GRN: IC1.C8 IC5.9 | length 1392.2
  Top Layer w5: v1(10462.01,9237.02) 10495.27,9237.02 10502.37,9229.92 IC1.C8@10502.37,9215.02 ; IC1.C8@10502.37,9215.02 10503.01,9215.02 IC1.C8@10502.69,9215.33 ; IC5.9@11075.97,8749.71 11103.69,8749.71 v1(11123.01,8769.02)
  Bottom Layer w5: v1(10462.01,9237.02) 10449.64,9224.65 10449.64,9209.3 10392.01,9151.66 10392.01,9057.56 10417.01,9032.56 10417.01,8777.75 10436.73,8758.02 10727.39,8758.02 10782.39,8813.02 10853.44,8813.02 10886.44,8780.02 10921.73,8780.02 10940.71,8799 11032.62,8799 11042.63,8809.02 11083.01,8809.02 v1(11123.01,8769.02)
LED2.RED: IC1.B7 IC5.13 | length 1065.2
  Top Layer w3: 10512.17,9169.21 10512.17,9185.44 IC1.B7@10522.06,9195.33
  Top Layer w5: v1(10462.01,9110.02) 10512.17,9160.18 10512.17,9169.16 10512.23,9169.21 ; v1(11015.01,8829.02) 11038.06,8852.07 IC5.13@11075.97,8852.07
  Bottom Layer w5: v1(10462.01,9110.02) 10462.01,9038.47 10480.01,9020.47 10480.01,8802.61 10497.59,8785.02 10716.21,8785.02 10771.21,8840.02 10969.46,8840.02 10980.46,8829.02 v1(11015.01,8829.02)
MCLK: IC1.G3 R27.1 SDCARD1.5 | length 3013.2
  Top Layer w5: R27.1@9742.34,9020.86 9770,9048.52 v1(9770,9082) ; v1(10578.01,9304.02) 10588.27,9293.76 IC1.G3@10600.8,9293.76 ; v1(10733.01,8939.02) 10765,8907.02 10765,8792.99 10757.01,8785 v1(10757.01,8749.02)
  Bottom Layer w5: SDCARD1.5@10224.68,9298.18 10224.68,9350.03 10202.01,9372.71 10202.01,9400.02 10173.01,9429.02 10089.02,9429.02 10044,9384 10008.01,9384 9997.01,9373 9997.01,9196.02 9984,9183.02 9772.02,9183.02 9719,9130 9719,9075.85 9727.83,9067.02 9755.02,9067.02 v1(9770,9082) 9784.98,9067.02 10060.67,9067.02 10072.67,9079.02 10290.28,9079.02 10408.01,8961.29 10408.01,8774.02 10433.01,8749.02 v1(10757.01,8749.02) ; v1(10578.01,9304.02) 10578.01,9274.19 10587.01,9265.19 10587.01,9188.02 10582.01,9183.02 10582.01,9090.02 10603.01,9069.02 10607.05,9069.02 10618.34,9057.72 10618.34,9027.22 10607.01,9015.88 10607.01,8947.96 10615.95,8939.02 v1(10733.01,8939.02)
MCMD: IC1.H2 R26.1 SDCARD1.2 | length 1123.6
  Top Layer w3: IC1.H2@10620.48,9313.44 10630.37,9303.55 10646.66,9303.55
  Top Layer w5: R26.1@10424.49,8826.07 10402,8848.57 10402,8880 10416,8894 v1(10499,8894) ; 10646.66,9303.55 10721.47,9303.55 v1(10730.01,9295.02)
  Bottom Layer w5: v1(10499,8894) 10499,8930 10490,8939 10490,9105 10519.96,9134.96 SDCARD1.2@10519.96,9298.18 10519.96,9309.02 10507.01,9309.02 10507.01,9393.02 10523.01,9409.02 10543.01,9409.02 10573.01,9379.02 10651.01,9379.02 10660.01,9370.02 10660.01,9309.48 10661.86,9307.63 10701.68,9307.63 10714.29,9295.02 v1(10730.01,9295.02)
MCU_HARD.TCK: IC1.A3 IC4.5 | length 294.7
  Top Layer w5: IC1.A3@10600.8,9175.65 10600.8,9155.23 10601.2,9155.23 ; 10601.2,9154.82 10602.02,9154 10719.91,9154 10768.79,9105.12 IC4.5@10854.51,9105.12
MCU_HARD.TDI: IC1.B4 IC4.7 | length 377.2
  Top Layer w3: 10571.22,9169.16 10571.22,9185.44 IC1.B4@10581.11,9195.33
  Top Layer w5: 10571.22,9169.16 10571.22,9142 10577.22,9136 10712.46,9136 10794.51,9053.94 IC4.7@10854.51,9053.94
MCU_HARD.TDO: IC1.A4 IC4.6 R34.1 | length 657.8
  Top Layer w5: IC1.A4@10581.11,9175.65 10581.11,9148.91 10585.02,9145 10716.18,9145 10781.65,9079.53 IC4.6@10854.51,9079.53 10896,9079.53 10901,9074.53 10901,9018 10909,9010 10944,9010 10966,8988 10966,8951 10977.36,8939.64 11006,8939.64 11020.76,8924.88 R34.1@11064.56,8924.88
MCU_HARD.TMS: IC1.B2 IC4.2 | length 239.6
  Top Layer w3: IC1.B2@10620.48,9195.33 10630.37,9185.44 10646.66,9185.44
  Top Layer w5: 10646.66,9185.44 10651.56,9185.44 10655.11,9181.89 IC4.2@10854.51,9181.89
MCU_SOFT.TCK: IC1.B5 IC4.9 | length 425.7
  Top Layer w3: 10551.54,9169.16 10551.54,9185.44 IC1.B5@10561.43,9195.33
  Top Layer w5: 10551.54,9169.15 10551.54,9129 10562.54,9118 10705,9118 10820.24,9002.76 IC4.9@10854.51,9002.76
MCU_SOFT.TDI: IC1.A2 IC4.4 | length 259.6
  Top Layer w5: IC1.A2@10620.48,9175.65 10620.48,9163.82 10621.3,9163 10723.64,9163 10755.93,9130.71 IC4.4@10854.51,9130.71
MCU_SOFT.TDO: IC1.A1 IC4.3 R35.1 | length 222.4
  Top Layer w5: IC1.A1@10640.17,9175.65 10643.82,9172 10727.37,9172 10743.06,9156.3 10772.84,9156.3 IC4.3@10854.51,9156.3
MCU_SOFT.TMS: IC1.A5 IC4.8 | length 379.7
  Top Layer w5: IC1.A5@10561.43,9175.65 10561.43,9132 10566.43,9127 10708.73,9127 10807.38,9028.35 IC4.8@10854.51,9028.35
MD0: IC1.H3 R28.1 SDCARD1.7 | length 1472.4
  Top Layer w5: R28.1@9831.15,9142.42 v1(9857.58,9142.42) ; v1(10393.01,9239.02) 10512.01,9358.02 10512.01,9402.02 10519.01,9409.02 10542.01,9409.02 10552.01,9399.02 10552.01,9339.02 10566.9,9324.13 10590.11,9324.13 IC1.H3@10600.8,9313.44
  Bottom Layer w5: v1(9857.58,9142.42) 9999.42,9142.42 10027.83,9170.83 SDCARD1.7@10027.83,9298.18 10027.83,9329.02 10047.01,9329.02 10047.01,9369.02 10067.01,9389.02 10150.28,9389.02 10150.59,9389.33 10175.68,9389.33 10183.01,9382 10183.01,9217.99 10191,9210 10191,9168.02 10250,9109.02 10302.01,9109.02 10327.01,9134.02 10327.01,9173.02 v1(10393.01,9239.02)
MD1: IC1.J2 R29.1 SDCARD1.8 | length 4102.8
  Top Layer w3: IC1.J2@10620.48,9333.13 10630.37,9323.24 10646.66,9323.24
  Top Layer w5: R29.1@9742.34,9142.42 v1(9742.34,9180.34) ; 10646.66,9323.24 10694.5,9323.24 10708.01,9336.75 10708.01,9459 10699.01,9468 10699.01,9524.69 10672.01,9551.69 10672.01,9568.02 10683.01,9579.02 10713.01,9579.02 10717.01,9575.02 10717.01,9535.02 10733.01,9519.02 10743.01,9519.02 10752.01,9510.02 10752.01,9481.86 10737.01,9466.86 10737.01,9388.02 10755.01,9370.02 10863.98,9370.02 10872,9362 10872,9317 10883,9306 10926.02,9306 10957.01,9275.02 10957.01,9241.99 10962.02,9236.98 10987.98,9236.98 10997,9246 10997,9268 11003.82,9274.82 11094.18,9274.82 11104.8,9264.2 11104.8,9243 11109.8,9238 11144.75,9238 11153.73,9229.02 11230.01,9229.02 11281,9178.02 11281,9053.01 v1(11257.01,9029.02)
  Bottom Layer w5: SDCARD1.8@9963.86,9298.18 9963.86,9203.86 9952.02,9192.02 9754.02,9192.02 v1(9742.34,9180.34) 9710,9148 9710,9072.12 9724.1,9058.02 10064.4,9058.02 10075.4,9069.02 10287.55,9069.02 10399.01,8957.56 10399.01,8770.29 10430.28,8739.02 10690,8739.02 10729.39,8699.63 11121.05,8699.63 11167.01,8745.58 11167.01,8876.02 11181.01,8890.02 11181.01,8956.73 11195.28,8971 11261.99,8971 11267.01,8976.02 11267.01,9003.6 11257.01,9013.6 v1(11257.01,9029.02)
MD2: IC1.J1 R24.1 SDCARD1.9 | length 280.4
  Top Layer w5: IC1.J1@10640.01,9333.13 IC1.J1@10640.17,9333.13 10658.11,9333.13 v1(10679.01,9354.02) ; v1(10803,9428) 10820,9428 10826.95,9421.05 R24.1@10826.95,9392.8
  Bottom Layer w5: v1(10679.01,9354.02) 10679.01,9379.02 10689.01,9389.02 SDCARD1.9@10716.81,9389.02 ; SDCARD1.9@10716.81,9388.73 SDCARD1.9@10716.82,9389.02 ; v1(10803,9428) 10742,9428 10716.82,9402.82 SDCARD1.9@10716.82,9389.02
MD3: IC1.J3 R25.1 SDCARD1.1 | length 768.5
  Top Layer w5: v1(10572.01,9348.02) 10572.73,9348.02 10587.62,9333.13 IC1.J3@10600.8,9333.13 10603.01,9333.13 10603.01,9334.02 IC1.J3@10602.35,9334.68 ; v1(10909,9134) 10909,9172 10964.98,9227.98 10992,9227.98 11020.53,9256.51 R25.1@11037.01,9256.51
  Bottom Layer w5: v1(10572.01,9348.02) 10606.6,9348.02 10618.39,9336.23 SDCARD1.1@10618.39,9278.5 10618.39,9160.61 10645,9134 v1(10909,9134)
NetC1_1: C1.1 IC1.M17 L1.1 L2.1 | length 573.3
  Top Layer w3: 10299.03,9402.07 10315.32,9402.07 IC1.M17@10325.21,9392.18
  Top Layer w5: C1.1@9983.65,9213.21 10049.46,9279.02 ; L1.1@10027.93,9400.17 L2.1@10027.93,9322.43 10027.93,9300.55 10049.46,9279.02 ; 10299.03,9402.07 10263.06,9402.07 10184.01,9323.02 10184.01,9290.02 10173.01,9279.02 10049.46,9279.02
NetC6_1: C6.1 IC6.3 R40.1 R45.2 | length 259.4
  Top Layer w5: R45.2@10003.01,10174.58 R45.2@10000.91,10174.58 10000.91,10140.58 10011.97,10129.53 IC6.3@10064.36,10129.53 ; R40.1@10088.17,10174.58 10088.17,10153.34 IC6.3@10064.36,10129.53 ; C6.1@10133.55,10174.58 10133.55,10153.18 10109.9,10129.53 IC6.3@10064.36,10129.53
NetCN2_2: CN2.2 R19.1 | length 598
  Top Layer w5: CN2.2@11167.35,9898.13 11203.13,9898.13 11211.4,9906.4 11211.4,9963.08 11164.01,10010.47 11164.01,10175.02 11133.01,10175.02 11127.01,10181.02 11127.01,10227.02 11129.01,10229.02 11163.01,10229.02 11177.01,10215.02 11177.01,10191.02 11187.01,10181.02 11187.01,10140.12 11198.39,10128.73 R19.1@11198.39,10103.73
NetCN2_3: CN2.3 IC3.5 R20.1 | length 658.6
  Top Layer w5: IC3.5@10996.22,9361.98 11030.01,9361.98 11056.38,9388.36 R20.1@11090.15,9388.36 11090.15,9369.87 11112.01,9348.02 11112.01,9320.02 11116,9316.02 11154.02,9316.02 11178,9340 11302.77,9340 11305,9342.23 11305,9383.86 11301.86,9387 11274,9387 11252.98,9408.02 11179.22,9408.02 11167.35,9419.9 CN2.3@11167.35,9496.55
NetCN3_18: CN3.18 D3.2 | length 505.2
  Top Layer w12: CN3.18@11197.86,8941.59 11227.59,8941.59 11305.19,9019.19 11305.19,9309.19 11356.19,9360.19 D3.2@11356.19,9363.76
NetD3_1: D3.1 R37.2 | length 58.5
  Top Layer w12: R37.2@11212.36,9364 D3.1@11267.27,9363.76 D3.1@11263.67,9363.76
NetD4_1: D4.1 IC6.1 L3.2 | length 147.1
  Top Layer w5: L3.2@10064.37,10019.02 L3.2@10064.37,9991.56 10093.01,9991.55 10103.82,10002.37 D4.1@10144.06,10002.37
  Top Layer w12: L3.2@10064.36,10019.03 IC6.1@10064.36,10054.53
NetIC1_H16: IC1.H16 R8.1 | length 414.4
  Top Layer w5: R8.1@10186.37,9020.86 10186.37,9042.05 10254.01,9109.68 v1(10254.01,9149.02) v1@10255.01,9149.02 ; IC1.H16@10344.89,9313.44 10355.56,9313.44 10358,9311 10358,9294.02 v1(10382.01,9270.02)
  Bottom Layer w5: v1(10254.01,9149.02) 10285.01,9149.02 10372.01,9236.02 10372.01,9245.66 10382.01,9255.66 v1(10382.01,9270.02)
NetIC1_J16: IC1.J16 R1.1 | length 847.4
  Top Layer w5: R1.1@10274.93,9771.61 10274.93,9748.07 10283.98,9739.02 v1(10328.01,9739.02) ; IC1.J16@10344.89,9333.13 10361.87,9333.13 10375.98,9319.02 10447.55,9319.02 10492.01,9363.47 10492.01,9418.02 10502.01,9428.02 10532.02,9428.02 10533.01,9429.01 v1(10533.01,9449.02)
  Bottom Layer w5: v1(10328.01,9739.02) 10473.01,9739.02 10512.01,9700.02 10512.01,9578.02 10493.01,9559.02 10493.01,9515.29 10533.01,9475.29 v1(10533.01,9449.02)
NetIC1_J17: IC1.J17 R7.1 | length 485.2
  Top Layer w3: 10299.03,9343.02 10315.32,9343.02 IC1.J17@10325.21,9333.13
  Top Layer w5: R7.1@10097.57,9020.86 10152.46,9020.86 10229.01,9097.41 10229.01,9302.29 10269.73,9343.02 10299.03,9343.02
NetIC1_K18: IC1.K18 R2.1 | length 2230.5
  Top Layer w5: v1(10093.01,9049.02) 10116.12,9072.13 10116.93,9072.13 ; 10116.93,9072.95 10164.2,9072.95 10187.01,9095.75 10187.01,9198.43 10220.01,9231.43 10220.01,9306.02 10266.8,9352.81 IC1.K18@10305.52,9352.81 ; v1(10253.01,9649.02) 10253.01,9713.77 10259.18,9719.95 10344.74,9719.95 10354.63,9729.84 10354.63,9751.93 R2.1@10334.96,9771.61
  Bottom Layer w5: v1(10093.01,9049.02) 9720.37,9049.02 9701,9068.39 9701,9630.41 9772.61,9702.02 10102.97,9702.02 10133.97,9671.02 10183.4,9671.02 10205.4,9649.02 v1(10253.01,9649.02)
NetIC1_L17: IC1.L17 R3.1 | length 860.5
  Top Layer w3: 10299.03,9382.39 10315.32,9382.39 IC1.L17@10325.21,9372.5
  Top Layer w5: R3.1@10008.76,9020.86 9991.73,9020.86 9969.89,8999.02 9903.01,8999.02 9897.01,9005.02 9897.01,9082.01 9905.95,9090.95 10155.53,9090.95 10169.01,9104.42 10169.01,9205.89 10202.01,9238.89 10202.01,9314.02 10270.38,9382.39 10299.03,9382.39
NetIC1_L18: IC1.L18 R6.1 | length 665
  Top Layer w5: R6.1@9919.96,9019.02 R6.1@9919.96,9020.86 9919.96,9069 9932.9,9081.95 10159.25,9081.95 10178.01,9100.7 10178.01,9202.16 10211.01,9235.16 10211.01,9310.02 10273.49,9372.5 IC1.L18@10305.52,9372.5 IC1.L18@10305.53,9372.02
NetIC1_N17: IC1.N17 L2.2 | length 251.9
  Top Layer w3: 10299.03,9421.76 10315.32,9421.76 IC1.N17@10325.21,9411.87
  Top Layer w5: L2.2@10146.05,9322.43 10163.42,9322.43 10202.01,9361.02 10202.01,9407.92 10211.11,9417.02 10249.73,9417.02 10254.47,9421.76 10299.03,9421.76
NetIC1_P16: IC1.P16 R4.1 | length 1153.9
  Top Layer w5: v1(9789,9103) 9831.15,9060.85 R4.1@9831.15,9020.86 ; IC1.P16@10344.9,9431.55 10355.77,9420.67 10391.62,9420.67 10444.28,9368.02 v1(10464.01,9368.02)
  Bottom Layer w5: v1(9789,9103) 9847.02,9103 9861,9089.02 10293.01,9089.02 10303.01,9079.02 10353.01,9079.02 10383.01,9109.02 10383.01,9155.39 10440.64,9213.02 10440.64,9243.65 10452.01,9255.02 10452.01,9330.75 10464.01,9342.75 v1(10464.01,9368.02)
NetIC1_P17: IC1.P17 L1.2 | length 200.4
  Top Layer w3: 10299.03,9441.44 10315.32,9441.44 IC1.P17@10325.21,9431.55
  Top Layer w5: L1.2@10146.05,9400.17 10161.16,9400.17 10196.01,9435.02 10241.01,9435.02 10247.43,9441.44 10299.03,9441.44
NetIC1_T15: IC1.T15 R5.1 | length 225.8
  Top Layer w5: IC1.T15@10363.01,9470.92 IC1.T15@10364.58,9470.92 10364.58,9456.45 v1(10372.01,9449.02) ; v1(10372.01,9602.02) 10372.01,9634.36 R5.1@10372.01,9638.02
  Bottom Layer w5: v1(10372.01,9449.02) 10372.01,9481.32 10359.7,9493.63 10359.7,9558.58 10372.01,9570.89 v1(10372.01,9602.02)
NetIC3_1: IC3.1 R31.2 | length 73.5
  Top Layer w5: IC3.1@10911.57,9399.39 10911.57,9419.02 10932.71,9440.16 R31.2@10932.71,9464.13
NetIC3_4: IC3.4 R30.2 | length 76.8
  Top Layer w5: R30.2@10975.07,9256.51 10975.07,9279.02 10996.22,9300.16 IC3.4@10996.22,9324.58
NetIC4_19: IC4.19 R32.2 R33.2 | length 1060.5
  Top Layer w5: R33.2@11198.9,8686.23 11196.58,8683.91 11187,8674.33 11187,8636.73 11228.87,8594.86 11290,8594.86 v1@11290.14,8594.86 ; v1(11290,8595) v1@11290.14,8594.86 ; R32.2@11302.74,8563.75 11290.14,8576.35 v1@11290.14,8594.86
  Bottom Layer w5: v1(11122,9176) 11131.51,9166.49 11321.51,9166.49 11362,9126 11362,8620 11337,8595 v1(11290,8595)
NetIC5_2: IC5.2 R36.2 | length 1553.1
  Top Layer w5: IC5.2@10857.46,8852.07 10820.93,8852.07 10816.01,8856.99 10816.01,8881.01 10827.06,8892.06 10848.06,8892.06 10864,8908 10864,8929 10871,8936 10919.99,8936 v1(10937.01,8953.02) ; R36.2@11145.31,10103.73 11145.31,10099.02 11147.01,10099.02 11147.01,10073.02 11104.58,10030.59 11104.58,9677.44 v1(11187.01,9595.02)
  Bottom Layer w5: v1(10937.01,8953.02) 11033,9049.01 11033,9380 11058,9405 11058,9491.29 11161.73,9595.02 v1(11187.01,9595.02)
NetIC5_4: IC5.4 R38.2 | length 1734.2
  Top Layer w5: v1(10749,9026) 10749,9005.51 10753,9001.51 10782.63,9001.51 10807.01,8977.14 10807.01,8824.99 10831.11,8800.89 IC5.4@10857.46,8800.89 ; v1(11087.01,9659.02) 11087.01,9700.1 11095.58,9708.68 11095.58,10034.32 11127.01,10065.75 11127.01,10153.02 11133.01,10159.02 11145.31,10159.02 R38.2@11145.31,10156.37
  Bottom Layer w5: v1(10749,9026) 10765.98,9009.02 10883.28,9009.02 11000,9125.74 11000,9386.27 11031,9417.27 11031,9640 11050.02,9659.02 v1(11087.01,9659.02)
NetIC5_6: IC5.6 R39.2 | length 1744.2
  Top Layer w5: IC5.6@10857.46,8749.71 10932.71,8749.71 10947,8764 10947,8932 10957,8942 10957,8977 10948,8986 v1(10930,8986) ; R39.2@11145.31,10209.02 11145.31,10194.02 11150.31,10189.02 11166.01,10189.02 11173.01,10182.02 11173.01,10014.2 11222.01,9965.2 v1(11222.01,9668.02)
  Bottom Layer w5: v1(10930,8986) 10957.26,8986 11023.89,9052.63 11023.89,9056.91 11023.89,9384.71 11049,9409.82 11049,9495.01 v1(11222.01,9668.02)
NetIC5_8: IC5.8 R43.2 | length 338.6
  Top Layer w5: IC5.8@11075.97,8724.12 11144.89,8724.12 11157.01,8712 11157.01,8648.33 11117.01,8608.33 11117.01,8505.02 11133.01,8489.02 11133.01,8490.95 R43.2@11137.43,8490.95
NetIC5_10: IC5.10 R46.2 | length 427.5
  Top Layer w5: v1(11058.19,8631.65) 11033.59,8656.25 11033.59,8767 11041.89,8775.3 IC5.10@11075.97,8775.3 ; R46.2@11137.43,8542.12 11165.47,8542.12 11177.01,8553.66 v1(11177.01,8576.02)
  Bottom Layer w5: v1(11058.19,8631.65) 11168.4,8631.65 11177.01,8623.04 v1(11177.01,8576.02)
NetIC5_12: IC5.12 R47.2 | length 359.6
  Top Layer w5: IC5.12@11075.97,8826.48 11109.48,8826.48 11122,8839 11149,8839 11154,8834 11154,8806 11143,8795 11143,8756.81 11167.01,8732.81 11167.01,8644.19 11137.43,8614.62 R47.2@11137.43,8593.29 11137.44,8589.02 R47.2@11140.01,8589.02
NetLED1_B: LED1.B R38.1 | length 214.1
  Top Layer w5: LED1.B@10910.6,10194.87 11048.35,10194.87 11064.1,10179.12 11064.1,10169.64 11076.87,10156.87 11102.94,10156.87 R38.1@11102.94,10156.37
NetLED1_G: LED1.G R36.1 | length 196
  Top Layer w5: LED1.G@10910.6,10094.87 11040.47,10094.87 11049.34,10103.73 R36.1@11102.94,10103.73
NetLED1_R: LED1.R R39.1 | length 207.2
  Top Layer w5: LED1.R@10910.6,10244.87 11023.33,10244.87 11059.18,10209.02 R39.1@11102.94,10209.02
NetLED2_B: LED2.B R46.1 | length 184.8
  Top Layer w5: LED2.B@10910.6,8541.32 10993.01,8541.32 10993.81,8542.12 R46.1@11095.07,8542.12
NetLED2_G: LED2.G R43.1 | length 205.3
  Top Layer w5: LED2.G@10910.6,8441.32 11031.32,8441.32 11080.46,8490.46 R43.1@11095.07,8490.46 ; R43.1@11095.07,8490.95 11095.07,8490.84 R43.1@11095.08,8490.46
NetLED2_R: LED2.R R47.1 | length 185.3
  Top Layer w5: LED2.R@10910.6,8591.32 10993.01,8591.32 10994.97,8593.29 R47.1@11095.07,8593.29
PROD_ID: D1.2 IC1.B1 R13.1 R14.1 | length 2578.5
  Top Layer w5: IC1.B1@10640.17,9195.33 10656.33,9195.33 10662,9201 v1(10714,9201) ; v1(10950,9162) 10950,9187.54 10972.44,9209.98 10999.46,9209.98 11014.48,9225 11145.02,9225 v1(11161.01,9209.02) ; R14.1@11239.28,10209.02 R13.1@11292.86,10209.02 11327.81,10174.06 D1.2@11327.81,10151.96 11327.81,10123.83 v1(11307.01,10103.02)
  Bottom Layer w5: v1(10714,9201) 10753,9162 v1(10950,9162) ; v1(11161.01,9209.02) 11143.01,9227.02 11143.01,9396.29 11286.19,9539.48 11286.19,9748.32 11275.5,9759.02 11124.01,9759.02 11093.01,9728.02 10944,9728.02 10940.26,9731.76 10940.26,9790.59 10904.01,9826.84 10904.01,10130.94 10915.08,10142.02 11168.66,10142.02 11190.66,10120.02 11290.01,10120.02 v1(11307.01,10103.02)
RESETN: IC1.T14 IC4.1 IC7.2 R41.1 | length 3735
  Top Layer w5: R41.1@9743,8899.97 v1(9743,8950) ; v1(10147.01,9043.02) 10210.01,9106.02 v1(10210.01,9190.02) ; IC1.T14@10383.01,9470.92 IC1.T14@10384.26,9470.92 10396.84,9458.34 10396.84,9455.18 v1(10412.01,9440.02) ; v1(10687.01,8715.02) 10663.01,8739.02 10663.01,8829.43 10678.78,8845.2 IC7.2@10697.08,8845.2 ; v1(10691,8885) 10697.08,8878.92 IC7.2@10697.08,8845.2 ; IC7.2@10695.14,8847.14 IC7.2@10697.08,8845.2 ; IC4.1@10854.51,9207.48 10886.48,9207.48 10909,9230 v1(10909,9281) ; v1(10951,9129) 10983,9129 10995,9117 v1(10995,9081)
  Bottom Layer w5: v1(9743,8950) 9707,8950 9701,8956 9701,9029.04 9711.98,9040.02 10064.4,9040.02 10080.42,9024 10127.99,9024 v1(10147.01,9043.02) 10176.47,9043.02 10187.35,9032.14 10187.35,8969.16 10198.18,8958.34 10238.52,8958.34 10250.2,8970.02 10361.09,8970.02 10381.01,8950.11 10381.01,8762.03 10443.41,8699.63 10468.86,8699.63 10499.25,8730.02 10643,8730.02 10658,8715.02 10666.12,8715.02 10667.36,8713.78 ; v1(10210.01,9190.02) 10241.28,9190.02 10249.28,9198.02 10308.55,9198.02 10352.01,9241.47 10352.01,9348.02 10387.01,9383.02 10387.01,9415.02 v1(10412.01,9440.02) ; 10667.36,8715.02 v1(10687.01,8715.02) ; v1(10691,8885) 10688,8882 10579,8882 10563,8898 10544,8898 10498.01,8852.01 10498.01,8810.06 10505.05,8803.02 10708.75,8803.02 10776.75,8871.02 10881.25,8871.02 10894.25,8858.02 10930.02,8858.02 10942,8870 10942,8901.73 10898,8945.73 10898,8998.29 10937.71,9038 10983.8,9038 10995,9049.2 v1(10995,9081) ; v1@10911,9283 10971,9223 10971,9149 v1(10951,9129)
SOFT.TCK: CN3.12 IC4.11 | length 167.9
  Top Layer w5: IC4.11@11078.92,8977.17 11145.17,8977.17 11153.01,8985.01 11153.01,9027.01 11162.08,9036.08 CN3.12@11197.86,9036.08
SOFT.TDI: CN3.3 IC4.16 | length 172.7
  Top Layer w5: IC4.16@11078.92,9105.12 11133.39,9105.12 11160,9131.73 11160,9170 11167.82,9177.82 CN3.3@11197.86,9177.82 ; CN3.3@11203.01,9177.82 CN3.3@11203.01,9179.02
SOFT.TDO: CN3.2 IC4.17 | length 175
  Top Layer w5: IC4.17@11078.92,9130.71 11118,9130.71 11122.71,9126 11141.54,9126 11151,9135.46 11151,9180 11160.02,9189.02 11166.63,9189.02 11171.17,9193.56 CN3.2@11197.86,9193.56
SOFT.TMS: CN3.11 IC4.12 | length 155.7
  Top Layer w5: IC4.12@11078.92,9002.76 11137.76,9002.76 11144.01,9009.01 11144.01,9037.01 11158.83,9051.83 CN3.11@11197.86,9051.83
SYS_RSTN: IC7.3 JTAG1.5 R44.1 | length 988
  Top Layer w5: JTAG1.5@10078.38,8629.21 10078.38,8694.02 10104.38,8720.02 10180.01,8720.02 10214,8686.02 10214,8567 10225.96,8555.04 10301.5,8555.04 10314.29,8567.83 10314.29,8776.3 10342.01,8804.02 10490.01,8804.02 10510.01,8824.02 ; 10510.01,8824.03 10512.01,8826.03 R44.1@10528.81,8826.03 10553.01,8826.03 10572.18,8845.2 IC7.3@10610.47,8845.2
TCK: IC1.V4 JTAG1.3 R15.1 | length 3444
  Top Layer w5: JTAG1.3@9978.38,8629.21 9978.38,8694.02 9983.38,8699.02 10017.01,8699.02 10037.01,8719.02 10037.01,8903.02 10063.01,8929.02 10375.73,8929.02 10401.6,8954.89 10448.87,8954.89 10472.49,8978.5 R15.1@10508.88,8978.5 10508.88,8966.02 10517.01,8957.89 v1(10517.01,8938.02) ; IC1.V4@10581.01,9509.02 10581.11,9509.02 IC1.V4@10581.11,9510.29 ; IC1.V4@10581.01,9510.29 10581.01,9532.47 10592.01,9543.47 10592.01,9557.29 10590.01,9559.29 v1@10590.01,9569.68
  Top Layer w12: v1@10590.01,9569.68 v1(10590.01,9579.02)
  Bottom Layer w5: v1(10517.01,8938.02) 10517.01,8912 10525,8904.01 10525,8893 10489.01,8857.01 10489.01,8806.33 10501.32,8794.02 10712.48,8794.02 10767.48,8849.02 10949,8849.02 10994,8894.02 10994,8997.29 11042,9045.29 11042,9250.73 11051,9259.73 11051,9260 11055,9264 11117.9,9264 11117.95,9263.95 11134.01,9280.01 11134.01,9400.02 11277.19,9543.21 11277.19,9744.59 11271.77,9750.02 11127.73,9750.02 11096.73,9719.02 10913.01,9719.02 10753.01,9559.02 10720.01,9559.02 10700.01,9539.02 10623.01,9539.02 10606.61,9555.41 10606.61,9562.41 v1(10590.01,9579.02)
TDI: IC1.T5 JTAG1.1 R12.1 | length 1583
  Top Layer w5: JTAG1.1@9878.38,8629.21 9878.38,8751.13 9932.4,8805.15 9932.4,8919.96 9961.46,8949.02 10323.67,8949.02 10330.03,8955.38 10330.03,8969.64 10338.89,8978.5 ; v1(10292.01,9129.02) 10292.01,9070.02 10327.01,9035.02 10327.01,8990.38 10338.89,8978.5 ; R12.1@10366.69,8978.5 10338.89,8978.5 ; v1(10383.01,9299.02) 10440.28,9299.02 10502.01,9360.75 10502.01,9408.02 10513.01,9419.02 10543.01,9419.02 10552.01,9428.02 10552.01,9461.5 IC1.T5@10561.43,9470.92
  Bottom Layer w5: v1(10292.01,9129.02) 10243.01,9129.02 10227.01,9145.02 10227.01,9163.02 10253.01,9189.02 10312.28,9189.02 10361.01,9237.75 10361.01,9296.01 10364.02,9299.02 v1(10383.01,9299.02)